# Altium PCB Driver Main Board-v1.0.PcbDoc (part 4 of 5)
Units mm, origin at the board's own origin, x right, y up, seen from the top; angles counter-clockwise.
Board outline 150 x 100 mm, 4 copper layers (Top Layer, Layer 1, Layer 2, Bottom Layer), stack 1.566 mm thick; 282 components, 222 nets, 936 pads, 397 vias.
Unrouted connection lines stored in the file: 249.
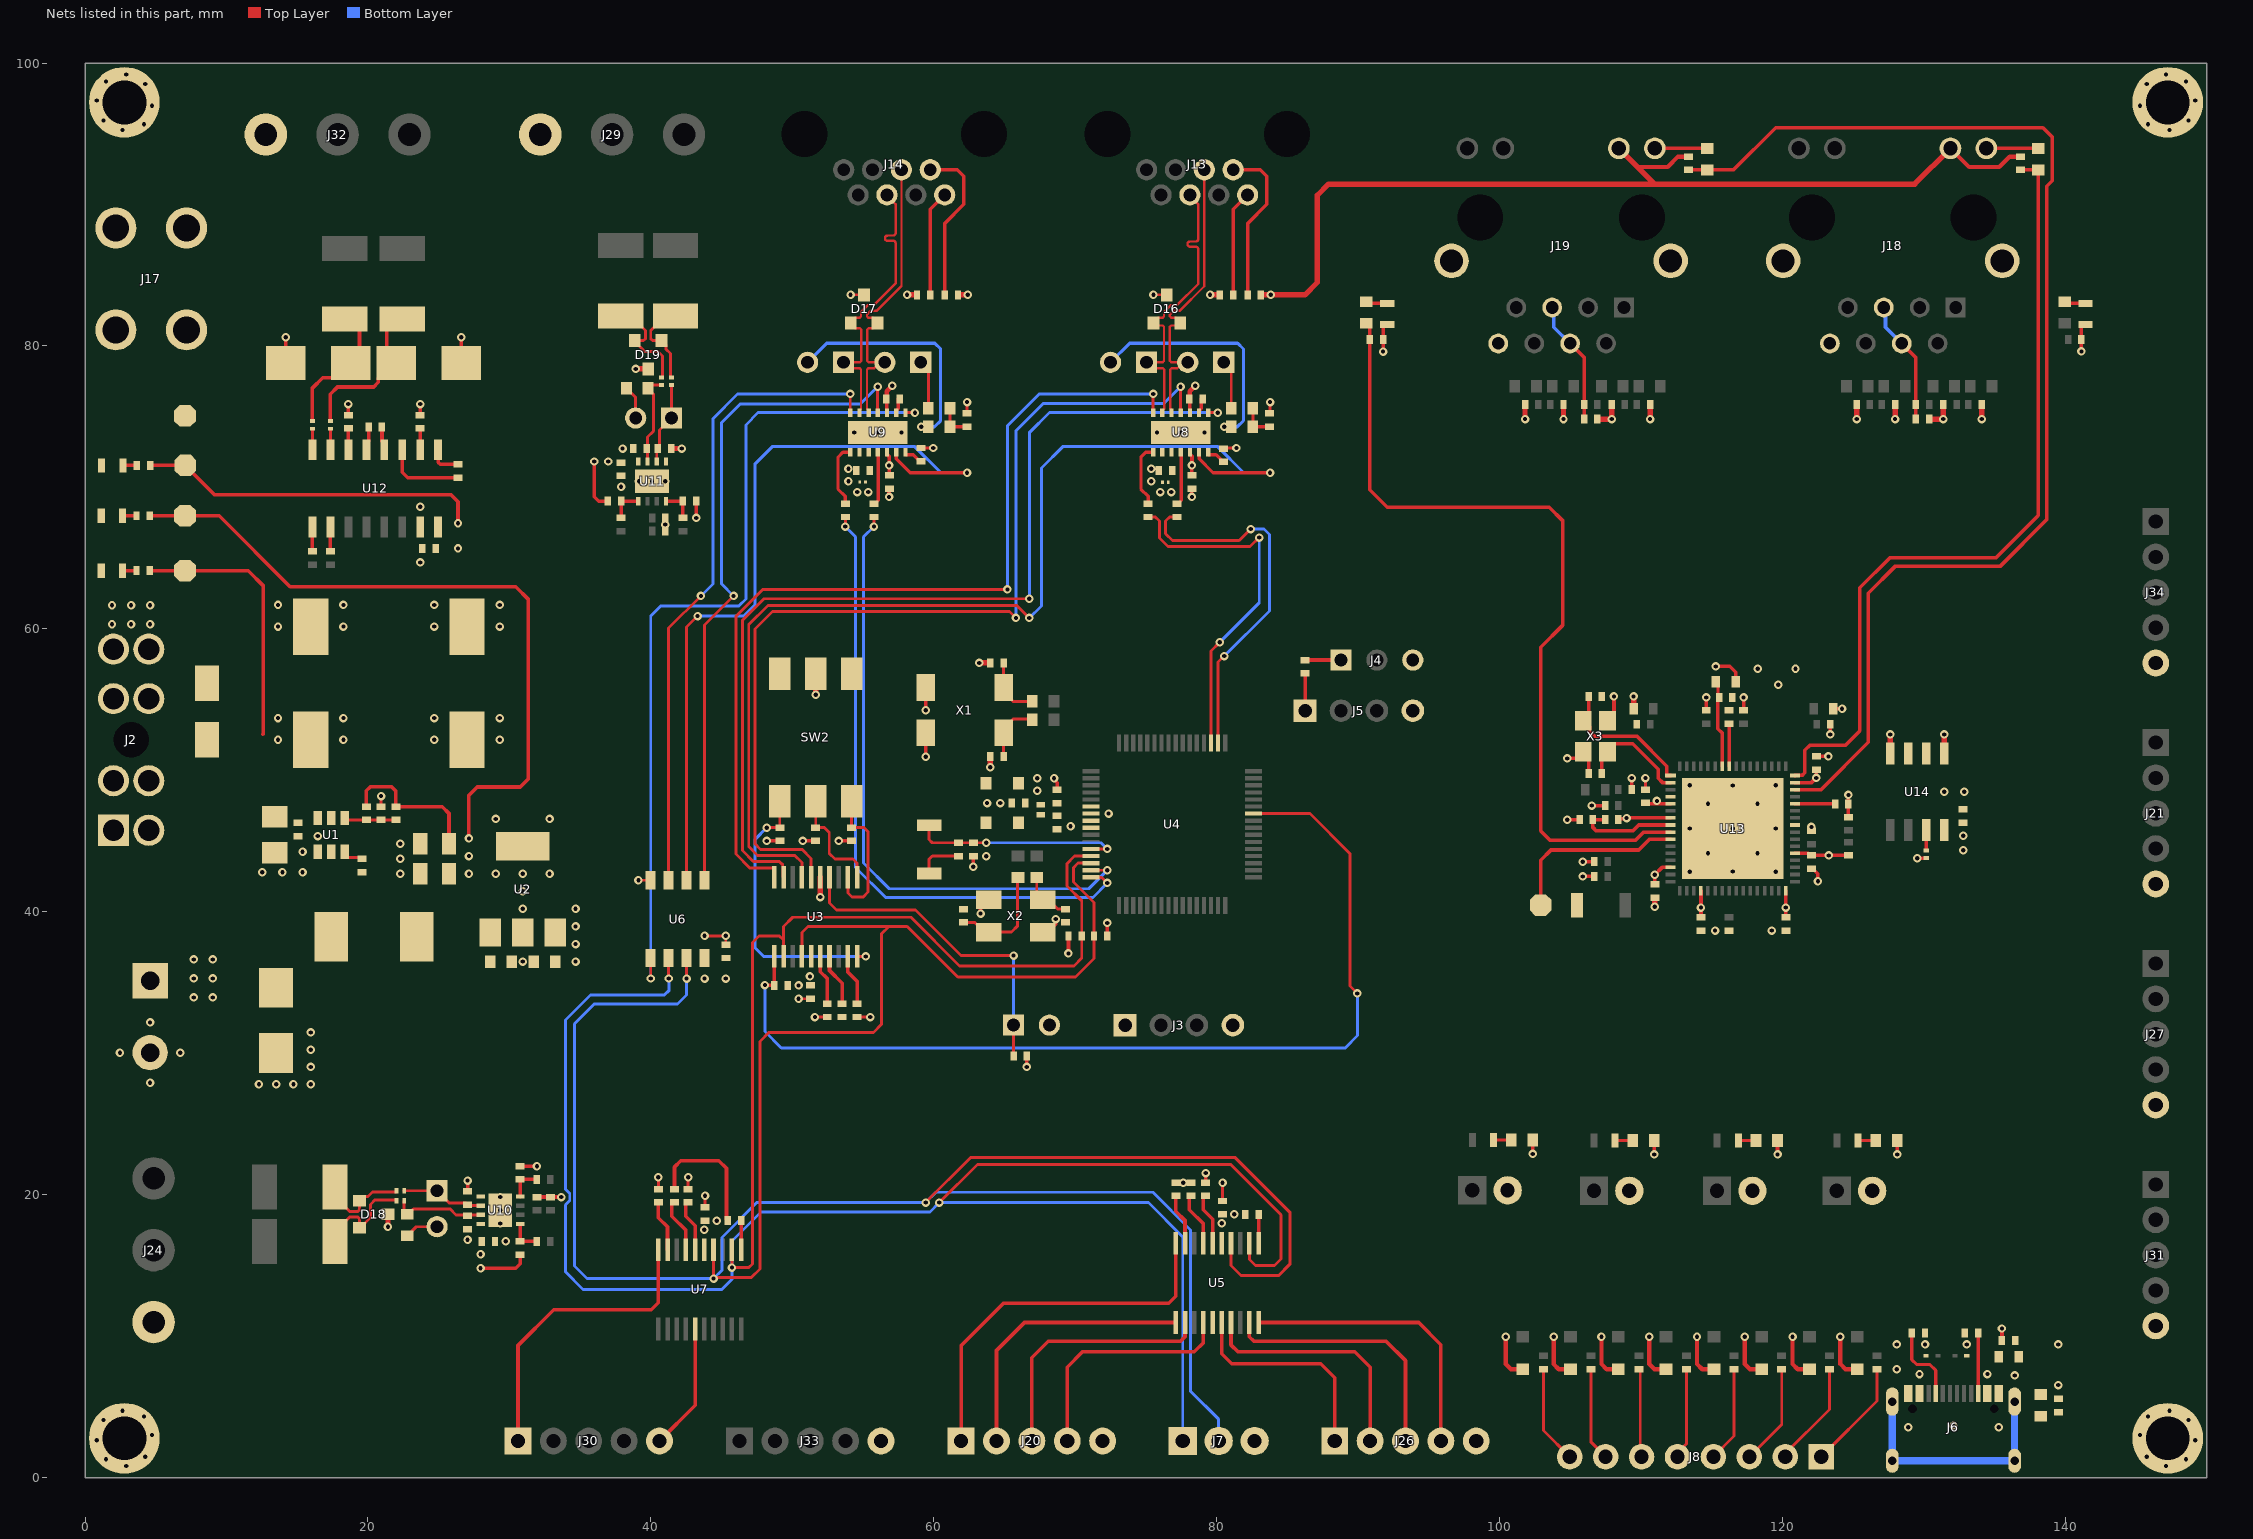
[diagram p4: the nets of this part, all layers, seen from the top]

## Via types
v1: diameter 0.6, hole 0.3, Top Layer to Bottom Layer, 397 vias

## Nets (pads, with @x,y where several pads share a name; then routed paths per layer and width w, separated by ;. In a path a pad name is that pad's centre, name@x,y a point inside that pad or via, vN(x,y) a via of type N, cw(c..) or ccw(c..) an arc to the next point about the centre after c; other vN are vias at no path point) (continued)
+3V3: (continued)
  Top Layer w0.254: R5.1@4.601,71.552 TP3.1@7.091,71.552 9.174,69.468 25.878,69.468 26.364,68.982 v1(26.364,67.461) ; R73.1@27.041,20.243 v1(27.041,20.999) ; v1(27.958,14.806) 30.44,14.806 30.758,15.124 R64.2@30.758,15.769 ; R70.2@30.758,22.02 v1(31.945,22.02) ; R66.2@31.945,19.836 R68.2@32.887,19.836 v1(33.655,19.836) ; v1(35.99,71.831) 35.99,69.349 36.308,69.031 R65.2@36.953,69.031 ; R69.2@41.02,66.902 v1(41.02,67.373) R67.2@41.02,67.843 ; R21.2@41.666,20.395 41.666,21.955 42.113,22.403 44.804,22.403 45.343,21.864 45.343,18.253 R19.2@45.436,18.16 ; v1(43.204,67.843) R71.2@43.204,69.031 ; v1(48.196,45.009) R42.2@49.111,45.009 ; v1(50.736,45.009) R41.2@51.651,45.009 ; v1(53.276,45.009) R32.2@54.191,45.009 ; U9.5@56.691,72.486 56.691,72.336 56.836,72.191 v1(56.836,71.554) 56.835,71.553 56.835,70.855 C28.2@56.833,70.853 ; v1(62.79,43.177) R43.2@62.79,43.939 ; v1(66.573,29.032) R112.2@66.573,29.821 ; v1(69.52,37.059) R28.2@69.52,38.216 ; R29.2@72.263,38.339 v1(72.263,39.215) ; U8.5@78.104,72.486 78.104,72.336 78.248,72.191 v1(78.248,71.554) 78.247,71.553 78.247,70.855 C26.2@78.246,70.853 ; R16.2@79.218,20.851 v1(79.218,21.531) ; J5.1@86.242,54.216 R6.2@86.242,56.857 ; v1(91.756,79.604) R110.2@91.756,80.442 91.756,81.386 91.879,81.509 LED9.1@92.056,81.509 ; v1(102.337,22.885) R23.1@102.337,23.868 ; v1(105.875,43.542) R92.1@106.695,43.542 ; R88.1@108.397,46.51 108.456,46.569 108.91,46.569 v1(108.969,46.628) ; v1@108.976,46.635 U13.7@112.074,46.635 ; C55.2@110.302,47.695 110.36,47.637 U13.5@112.072,47.637 ; v1(110.934,22.851) R24.1@110.934,23.833 ; C46.2@110.967,41.941 v1(110.967,42.622) 111.48,43.135 U13.14@112.074,43.135 ; v1@111.121,47.637 U13.5@112.072,47.637 ; U13.5@112.074,47.635 U13.5@112.072,47.637 ; C48.2@114.229,39.614 U13.20@114.229,41.491 ; v1(115.282,57.346) 116.27,57.346 116.682,56.934 FB3.1@116.682,56.254 ; v1(119.64,22.851) R25.1@119.64,23.833 ; C50.2@120.229,39.614 U13.32@120.229,41.491 ; U13.37@120.874,44.135 121.796,44.135 121.948,43.983 C52.2@122.037,43.983 122.04,43.986 124.65,43.986 R86.2@124.653,43.99 ; U13.47@120.874,49.135 122.042,49.135 122.367,49.46 v1(122.376,49.46) v1(122.376,49.46) 122.378,50.042 C54.2@122.38,50.044 ; FB1.1@123.597,54.347 v1(124.201,54.347) ; R87.2@124.653,46.695 R91.1@124.653,47.635 v1(124.653,48.26) ; v1(128.104,22.851) R26.1@128.104,23.833 ; v1(141.121,79.609) R106.2@141.121,80.447 141.121,81.386 141.244,81.509 LED8.1@141.421,81.509
  Top Layer w0.381: R75.1@41.427,72.748 v1(42.183,72.748) ; FB2.1@109.468,54.347 v1@109.468,55.222
  other v1: 27.958,15.794 43.776,17.526 80.358,17.982 44.662,18.16 81.244,18.616 50.44,34.797 43.795,35.281 45.294,35.281 51.244,35.432 34.671,36.477 34.671,37.721 34.671,38.964 34.671,40.208 114.229,40.296 120.229,40.296 123.269,43.986 132.769,44.342 132.769,45.383 72.349,46.939 111.121,47.84 67.319,48.558 67.319,49.439 109.468,55.223 26.364,65.684 36.978,71.831
+5V: C7.2 C8.2 C9.2 C10.2 C25.1 C27.1 D14.1 D15.1 L1.2 R1.2 R4.1 R46.1 R47.1 R113.2 TP2.1 U2.1 U8.3 U8.10 U9.3 U9.10 | length 65.3
  Top Layer w0.254: R4.1@4.576,67.996 TP2.1@7.065,67.996 9.477,67.996 14.492,62.98 30.441,62.98 31.344,62.078 31.344,49.403 30.759,48.819 27.726,48.819 27.137,48.23 v1(27.137,45.187) ; C7.2@19.882,47.436 19.882,48.55 20.159,48.827 21.682,48.827 21.971,48.538 R1.2@21.971,47.434 25.248,47.434 25.73,46.952 C9.2@25.73,44.806 ; R47.1@56.653,76.251 56.672,76.232 56.672,75.305 U9.10@56.691,75.286 ; R46.1@78.063,76.251 78.104,76.21 U8.10@78.104,75.286 ; R113.2@135.507,9.704 v1(135.507,10.542)
  Top Layer w0.305: R47.1@56.676,76.251 56.676,76.794 v1(57.069,77.188) ; R46.1@78.088,76.251 78.088,76.794 v1(78.482,77.188)
  other v1: 27.137,42.697 27.137,43.942 54.591,69.669 55.366,69.669 76.004,69.669 76.778,69.669
+24V: C1.1 C2.1 C4.2 C5.2 D22.1 R3.1 TP1.1 U1.2 U1.3 | length 19
  Top Layer w0.254: R3.1@4.576,64.11 TP1.1@7.065,64.11 11.532,64.11 12.609,63.032 12.609,57.879 12.609,52.589 12.573,52.553
  other v1: 13.64,52.159 18.263,52.159 24.689,52.159 29.312,52.159 13.64,53.696 18.263,53.696 24.689,53.696 29.312,53.696
CAN1_N: D16.2 J10.2 J13.5 U8.12 | length 21.4
  Top Layer w0.165: U8.12@76.804,75.286 76.738,75.353 76.738,75.569 76.707,75.6 76.707,78.326 76.804,78.422 77.207,78.422 J10.2@77.626,78.842 ; J10.2@77.965,78.842 J10.2@77.626,78.842 ; J13.5@79.122,92.456 79.119,92.453 79.119,84.222 77.374,82.477 76.937,82.477 76.688,82.228 76.688,82.091 76.784,81.994 77.101,81.994 77.428,81.667 D16.2@77.428,81.617 77.261,81.45 76.784,81.45 76.688,81.353 76.688,78.938 76.784,78.842 J10.2@77.626,78.842
CAN1_P: D16.1 J9.1 J13.4 U8.13 | length 21.4
  Top Layer w0.165: U8.13@76.154,75.286 76.155,75.436 76.288,75.568 76.288,78.326 76.191,78.422 75.449,78.422 J9.1@75.03,78.842 76.172,78.842 76.268,78.938 76.268,81.353 76.172,81.45 75.695,81.45 D16.1@75.528,81.617 75.528,81.667 75.855,81.994 76.172,81.994 76.268,82.091 76.268,82.401 76.764,82.896 77.2,82.896 78.7,84.396 78.7,86.749 78.7,86.832 ccw(c78.515,86.832) 78.515,87.016 78.116,87.016 cw(c78.116,87.2) 78.116,87.384 78.515,87.384 ccw(c78.515,87.569) 78.7,87.569 78.7,89.178 78.7,90 78.102,90.598 J13.4@78.102,90.676
CAN1_RX: R48.2 U4.50 | length 26.1
  Top Layer w0.203: R48.2@77.174,67.907 76.677,67.907 76.387,67.618 76.387,66.728 76.872,66.243 81.585,66.243 v1(82.398,67.056) ; U4.50@80.094,51.939 80.094,57.648 v1(80.525,58.078)
  Bottom Layer w0.203: v1(80.525,58.078) 83.719,61.273 83.719,66.666 83.329,67.056 v1(82.398,67.056)
CAN1_TX: R49.2 U4.51 | length 25.6
  Top Layer w0.203: R49.2@75.156,67.907 75.654,67.907 75.943,67.618 75.943,66.421 76.552,65.811 82.361,65.811 83.001,66.451 v1(83.002,66.451) ; U4.51@79.595,51.939 79.595,58.442 v1(80.212,59.06)
  Bottom Layer w0.203: v1(80.212,59.06) 83.002,61.85 v1(83.002,66.451)
CAN2_N: D17.2 J12.2 J14.5 U9.12 | length 21.3
  Top Layer w0.165: U9.12@55.391,75.286 55.391,75.436 55.271,75.556 55.271,78.326 55.368,78.422 55.781,78.422 J12.2@56.2,78.842 ; J12.2@56.539,78.842 J12.2@56.2,78.842 ; J14.5@57.719,92.447 57.719,84.242 55.954,82.477 55.525,82.477 55.275,82.228 55.275,82.091 55.372,81.994 55.688,81.994 56.016,81.667 56.016,81.567 55.688,81.239 55.385,81.239 55.288,81.143 55.288,78.938 55.385,78.842 J12.2@56.2,78.842
CAN2_P: D17.1 J11.1 J14.4 U9.13 | length 21.3
  Top Layer w0.165: U9.13@54.741,75.286 54.741,75.436 54.852,75.546 54.852,78.326 54.755,78.422 54.037,78.422 J11.1@53.618,78.842 54.772,78.842 54.869,78.938 54.869,81.143 54.772,81.239 54.443,81.239 54.116,81.567 D17.1@54.116,81.617 54.116,81.667 54.443,81.994 54.76,81.994 54.856,82.091 54.856,82.401 55.351,82.896 55.781,82.896 57.3,84.415 57.3,87.168 57.3,87.25 ccw(c57.116,87.25) 57.116,87.434 56.73,87.434 cw(c56.73,87.618) 56.73,87.803 57.116,87.803 ccw(c57.116,87.987) 57.3,87.987 57.3,88.499 57.3,90.012 56.689,90.623 J14.4@56.689,90.676
CAN2_RX: R50.2 U4.15 | length 44.5
  Top Layer w0.203: v1(55.762,67.234) R50.2@55.762,67.907 ; U4.15@71.095,42.939 v1(72.263,42.939)
  Bottom Layer w0.203: v1(55.762,67.234) 55.034,66.506 55.034,43.447 56.85,41.631 70.954,41.631 v1(72.263,42.939)
CAN2_TX: R51.2 U4.16 | length 45.5
  Top Layer w0.203: v1(53.744,67.234) R51.2@53.744,67.907 ; U4.16@71.095,42.439 71.099,42.435 71.865,42.435 v1(72.263,42.037)
  Bottom Layer w0.203: v1(53.744,67.234) 54.472,66.506 54.472,43.14 56.596,41.016 71.242,41.016 v1(72.263,42.037)
"CHASIS GND": "J18.Shield 1" "J18.Shield 2" "J19.Shield 1" "J19.Shield 2" J17.1 J18.8 J19.8 pad.MH1
  other v1: 2.904,0.82 147.096,0.82 1.484,1.303 148.516,1.303 4.25,1.482 145.75,1.482 0.821,2.648 149.179,2.648 4.732,3.014 145.268,3.014 1.304,4.069 148.696,4.069 4.172,4.324 145.828,4.324 2.65,4.731 147.35,4.731 2.65,95.269 147.35,95.269 4.172,95.676 145.828,95.676 1.304,95.931 148.696,95.931 4.732,96.986 145.268,96.986 0.821,97.352 149.179,97.352 4.25,98.518 145.75,98.518 1.484,98.697 148.516,98.697 2.904,99.18 147.096,99.18
EN_CAN: U3.17 U8.6 | length 76.1
  Top Layer w0.203: U3.17@50.676,42.448 50.676,43.474 50.173,43.977 47.544,43.977 46.916,44.605 46.916,60.303 48.274,61.661 65.866,61.661 v1(66.751,60.776)
  Top Layer w0.229: U8.6@78.754,72.486 78.762,72.477 78.762,72.016 79.734,71.044 v1(83.766,71.044)
  Bottom Layer w0.203: v1(66.751,60.776) 67.602,61.626 67.602,71.365 69.116,72.879 80.067,72.879 81.902,71.044 v1(83.766,71.044)
EN_CAN_2: U6.2 U9.6 | length 55.5
  Top Layer w0.203: U6.2@42.525,42.233 42.525,60.127 v1(43.303,60.905)
  Top Layer w0.229: U9.6@57.341,72.486 57.35,72.477 57.35,72.016 58.322,71.044 v1(62.354,71.044)
  Bottom Layer w0.203: v1(43.303,60.905) 46.553,60.905 47.371,61.723 47.371,71.671 48.579,72.879 58.654,72.879 60.49,71.044 v1(62.354,71.044)
ERRLED: R110.1 R111.2 U13.9 | length 58.7
  Top Layer w0.254: R111.2@90.575,81.598 90.816,81.357 R110.1@90.816,80.442 90.816,69.839 92.05,68.605 103.505,68.605 104.445,67.666 104.445,60.243 102.898,58.696 102.898,45.717 103.555,45.059 109.605,45.059 110.181,45.635 U13.9@112.074,45.635
GND: C1.2 C2.2 C4.1 C5.1 C8.1 C9.1 C10.1 C11.1 C12.1 C13.1 C14.1 C15.2 C16.1 C17.1 C18.1 C19.1 C20.1 C21.1 C22.1 C23.1 C24.1 C25.2 C26.1 C27.2 C28.1 C29.2 C30.2 C31.1 C32.1 C33.1 C34.1 C37.1 C38.1 C39.1 C40.1 C41.1 C42.1 C43.1 C44.1 C45.1 C46.1 C47.1 C48.1 C49.1 C50.1 C51.1 C52.1 C53.1 C54.1 C55.1 C56.1 C57.1 C58.1 C59.1 C60.1 C61.1 C62.1 C63.1 C64.1 C65.1 C66.1 D1.1 D2.2 D3.2 D4.2 D5.2 D6.2 D7.2 D8.2 D9.2 D10.2 D11.2 D12.2 D13.2 D14.2 D15.2 D16.3 D17.3 D18.3 D19.3 D20.1 D21.1 J1.2 J3.4 J4.3 J5.4 J6.A1/B12 J6.B1/A12 J7.3 J18.10 J19.10 J20.5 J21.5 J22.2 J23.2 J24.3 J25.2 J26.5 J27.5 J28.2 J29.3 J30.5 J31.5 J32.3 J33.5 J34.5 J35.2 LED1.2 LED2.2 LED3.2 R2.1 R12.2 R13.2 R14.2 R17.2 R18.2 R20.2 R22.2 R27.2 R30.2 R31.2 R44.1 R45.1 R56.1 R57.1 R58.1 R59.1 R72.2 R74.2 R89.1 R90.1 R97.2 R108.1 R109.1 SW1.1 SW2.4 SW2.5 SW2.6 SW3.1 TP4.1 U1.4 U2.2 U2.4 U3.15 U4.9 U5.15 U6.4 U7.15 U8.2 U8.15 U9.2 U9.15 U10.5 U10.9 U11.5 U11.9 U12.15 U13.4 U13.41 U13.65 U14.1 U14.2 U14.3 U14.4 X1.2 X1.3 X2.2 X2.4 X3.2 X3.4 | length 173.1
  Top Layer w0.203: R2.1@20.927,47.434 v1(20.927,48.184) ; v1(39.116,42.233) U6.4@39.985,42.233 ; R22.2@40.526,20.395 v1(40.526,21.234) ; R20.2@42.636,20.395 v1(42.636,21.234) ; v1(43.795,38.298) v1(45.294,38.298) C18.1@45.294,37.673 ; C19.1@43.827,19.1 v1(43.827,19.926) ; v1(50.44,33.857) C16.1@51.275,33.857 ; v1(51.593,32.562) R12.2@52.466,32.562 ; v1(54.116,83.617) D17.3@55.066,83.617 ; R14.2@54.576,32.562 v1(55.508,32.562) ; SW1.1@59.666,42.709 59.666,43.711 59.895,43.939 C24.1@61.749,43.939 ; X2.2@67.827,38.573 68.077,38.573 68.626,39.121 v1(68.626,39.482) ; v1(75.528,83.617) D16.3@76.478,83.617 ; v1@77.425,20.851 R17.2@78.163,20.851 ; C17.1@80.409,19.556 v1(80.409,20.851)
  Top Layer w0.229: R45.1@59.091,72.786 v1(59.968,72.786) ; C30.2@62.353,75.235 v1(62.353,76.035) ; R44.1@80.503,72.786 v1(81.392,72.786) ; C29.2@83.766,75.235 v1(83.766,76.035) ; C47.1@109.337,48.635 v1(109.337,49.455) ; C55.1@110.302,48.635 v1(110.302,49.455)
  Top Layer w0.254: D20.1@14.195,78.791 v1(14.195,80.62) ; C34.1@18.614,75.108 v1(18.614,75.895) ; C33.1@23.694,75.108 v1(23.694,75.895) ; D21.1@26.595,78.791 v1(26.595,80.62) ; J30.5@40.604,2.591 43.126,5.112 U7.15@43.126,10.509 ; v1(56.833,69.326) C28.1@56.833,69.913 ; v1(59.432,50.964) X1.3@59.432,52.654 ; v1(59.432,54.254) X1.2@59.432,55.854 ; v1(63.302,39.872) 63.302,40.366 63.808,40.873 X2.4@64.027,40.873 ; v1(68.503,49.439) 68.503,49.345 68.716,49.132 C21.1@68.716,48.628 ; v1(78.246,69.326) C26.1@78.246,69.913 ; v1(104.778,46.51) R89.1@105.654,46.51 ; v1(104.778,50.844) 105.305,50.844 ; v1(105.875,42.5) C43.1@106.695,42.5 ; X3.2@105.907,51.311 106.288,50.931 C41.1@106.288,49.772 ; v1(106.507,47.51) C49.1@107.457,47.51 ; X3.4@107.607,53.511 108.08,53.984 v1(108.08,55.223) ; C44.1@114.603,54.248 v1(114.603,55.153) ; C45.1@117.241,54.248 v1(117.241,55.153) ; C52.1@122.037,43.043 122.126,43.043 122.482,42.688 122.482,42.17 v1(122.495,42.157) ; C54.1@122.381,50.984 v1@123.239,50.984 ; v1(123.367,52.539) C39.1@123.367,53.257 ; v1(129.517,43.792) R97.2@130.152,43.792
  Top Layer w0.305: v1(100.436,9.952) 100.436,8.035 100.804,7.668 D4.2@101.63,7.668 ; v1(103.815,9.952) 103.815,8.035 104.182,7.668 D5.2@105.008,7.668 ; v1(107.193,9.952) 107.193,8.035 107.56,7.668 D6.2@108.386,7.668 ; 109.744,92.649 111.879,92.649 112.612,93.382 R109.1@113.359,93.382 ; v1(110.571,9.952) 110.571,8.035 110.938,7.668 D7.2@111.765,7.668 ; v1(113.949,9.952) 113.949,8.035 114.317,7.668 D8.2@115.143,7.668 ; v1(117.327,9.952) 117.327,8.035 117.695,7.668 D9.2@118.521,7.668 ; v1(120.706,9.952) 120.706,8.035 121.073,7.668 D10.2@121.899,7.668 ; v1(124.084,9.952) 124.084,8.035 124.451,7.668 D12.2@125.277,7.668 ; J18.10@131.867,93.966 133.184,92.649 135.319,92.649 136.052,93.382 R108.1@136.799,93.382
  Top Layer w0.381: v1(21.414,17.738) D18.3@21.414,18.616 ; v1(38.922,78.375) D19.3@39.8,78.375 ; v1(51.651,55.347) SW2.5@51.651,56.824 ; v1(51.976,41.044) U3.15@51.976,42.448 ; v1(58.112,83.617) R59.1@58.81,83.617 ; R58.1@61.709,83.617 v1(62.406,83.617) ; v1(63.205,57.594) C14.1@63.992,57.594 ; v1(63.992,50.209) C15.2@63.992,50.964 ; v1(79.525,83.617) R57.1@80.222,83.617 ; R56.1@83.121,83.617 v1(83.819,83.617) 86.24,83.617 87.104,84.482 87.104,90.645 87.899,91.44 110.953,91.44 ; v1(101.793,74.828) C58.1@101.793,75.844 ; v1(104.512,74.828) C60.1@104.512,75.844 ; C66.1@106.912,74.828 v1(107.915,74.828) C62.1@107.915,75.844 ; J19.10@108.427,93.966 109.744,92.649 110.953,91.44 ; v1(110.633,74.828) C64.1@110.633,75.844 ; v1(110.967,40.361) C46.1@110.967,41.002 ; v1(125.233,74.828) C57.1@125.233,75.844 ; U14.4@127.612,51.182 v1(127.612,52.539) ; v1(127.952,74.828) C59.1@127.952,75.844 ; C65.1@130.351,74.828 v1(131.355,74.828) C61.1@131.355,75.844 ; U14.1@131.422,51.182 v1(131.422,52.539) ; J18.10@131.867,93.966 129.34,91.44 110.953,91.44 ; v1(134.073,74.828) C63.1@134.073,75.844
  other v1: 128.877,3.57 135.277,3.57 139.487,6.545 136.402,7.223 128.071,7.668 128.071,9.418 130.067,9.418 133.017,9.418 139.487,9.418 29.736,16.708 27.041,16.817 29.358,17.966 29.358,18.901 29.358,19.836 77.639,20.851 12.294,27.813 13.513,27.813 14.732,27.813 15.951,27.813 4.6,27.907 15.951,29.032 2.464,30.043 6.736,30.043 15.951,30.251 15.951,31.471 4.6,32.179 30.937,36.477 115.229,38.674 119.229,38.674 30.937,40.208 30.937,41.453 22.288,42.697 29.037,42.697 30.937,42.697 32.837,42.697 12.522,42.797 13.951,42.797 15.38,42.797 113.438,42.831 119.51,42.831 116.474,42.849 22.288,43.752 63.698,43.929 114.724,44.135 118.224,44.135 15.38,44.241 22.281,44.806 16.449,45.352 113.438,45.885 116.474,45.885 119.51,45.885 122.039,45.998 69.665,46.048 29.037,46.565 32.837,46.565 114.724,47.635 118.224,47.635 63.763,47.688 64.703,47.688 131.422,48.482 132.845,48.482 116.474,48.921 113.438,48.939 119.51,48.939 123.24,50.985 119.698,56.047 118.246,57.175 120.912,57.175 13.64,60.159 18.263,60.159 24.689,60.159 29.312,60.159 13.64,61.696 18.263,61.696 24.689,61.696 29.312,61.696 23.694,64.694 23.694,68.631 37.892,70.053 39.15,70.431 40.085,70.431 41.02,70.431 53.966,70.434 75.378,70.434 53.966,71.327 75.378,71.327 38.001,72.748 54.368,73.886 56.041,73.886 57.715,73.886 75.78,73.886 77.454,73.886 79.127,73.886
I2C3_SCL: J7.1 R28.1 U3.2 U4.13 U5.2 U6.6 U7.2 | length 188
  Top Layer w0.203: v1(41.255,35.284) U6.6@41.255,36.733 ; U7.2@45.726,16.109 v1(45.726,14.853) 46.914,14.853 47.174,15.113 47.174,37.832 47.64,38.298 49.074,38.298 49.376,37.996 ; U3.2@49.376,36.848 49.376,37.996 ; v1(60.388,19.443) 63.081,22.136 80.994,22.136 84.551,18.579 84.551,15.463 84.092,15.004 82.729,15.004 82.308,15.425 U5.2@82.308,16.565 ; U4.13@71.095,43.939 69.956,43.939 69.413,43.396 69.413,41.831 70.46,40.784 R28.1@70.46,38.278 70.46,36.728 69.901,36.17 61.824,36.17 58.383,39.61 50.021,39.61 49.376,38.965 49.376,37.996
  Bottom Layer w0.203: v1@41.292,35.284 41.292,34.456 40.948,34.112 35.729,34.112 33.96,32.343 33.96,20.386 34.26,20.086 34.26,19.585 33.96,19.285 33.96,14.554 35.204,13.31 45.009,13.31 45.726,14.027 v1(45.726,14.853) 45.726,16.724 47.786,18.785 59.729,18.785 v1(60.388,19.443) 75.172,19.443 77.597,17.018 J7.1@77.597,2.591
I2C3_SDA: J7.2 R29.1 U3.4 U4.14 U5.4 U6.7 U7.4 | length 202.6
  Top Layer w0.203: v1(42.525,35.281) U6.7@42.525,36.733 ; v1(44.426,14.071) U7.4@44.426,16.109 ; v1@44.527,14.147 47.094,14.147 47.701,14.754 47.701,30.842 48.33,31.471 55.728,31.471 56.312,32.054 56.312,38.448 56.827,38.964 ; U3.4@50.676,36.848 50.676,38.541 51.098,38.964 56.827,38.964 ; v1(59.423,19.443) 62.598,22.618 81.312,22.618 85.166,18.764 85.166,15.088 84.379,14.3 81.712,14.3 81.008,15.004 U5.4@81.008,16.565 ; U4.14@71.095,43.439 70.199,43.439 69.875,43.115 69.875,42.102 71.323,40.654 R29.1@71.323,38.278 ; R29.1@71.277,38.324 R29.1@71.323,38.278 ; 56.827,38.964 58.115,38.964 61.697,35.382 70.019,35.382 71.323,36.687 R29.1@71.323,38.278
  Bottom Layer w0.203: v1(42.525,35.281) 42.525,34.112 41.89,33.477 35.992,33.477 34.595,32.08 34.595,14.961 35.485,14.071 v1(44.426,14.071) 45.015,14.66 45.015,16.974 47.485,19.443 v1(59.423,19.443) 60.153,20.173 75.483,20.173 78.152,17.504 78.152,6.108 80.137,4.123 J7.2@80.137,2.591
ID0: R42.1 SW2.1 U3.10 | length 20.3
  Top Layer w0.203: v1(48.196,45.949) R42.1@49.111,45.949 SW2.1@49.111,47.824 ; U3.10@54.576,36.848 v1(55.194,36.848)
  Bottom Layer w0.203: v1(48.196,45.949) 47.371,45.124 47.371,37.451 47.974,36.848 v1(55.194,36.848)
ID1: R41.1 SW2.2 U3.11 | length 7.7
  Top Layer w0.203: SW2.2@51.651,47.824 R41.1@51.651,45.949 52.255,45.949 52.606,45.597 52.606,44.124 53.009,43.721 54.285,43.721 54.575,43.432 U3.11@54.576,42.448 U3.11@54.576,42.448
ID2: R32.1 SW2.3 U3.12 | length 10.2
  Top Layer w0.203: U3.12@53.926,42.448 53.926,41.326 54.207,41.044 55.008,41.044 55.357,41.393 55.357,45.656 55.064,45.949 R32.1@54.191,45.949 SW2.3@54.191,47.824
IND-ZC: J35.1 R112.1 U3.14 | length 23.5
  Top Layer w0.203: U3.14@52.626,42.448 52.626,40.622 53.116,40.132 58.699,40.132 61.925,36.906 v1(65.634,36.906) ; R112.1@65.634,29.821 J35.1@65.634,31.991
  Bottom Layer w0.203: J35.1@65.634,31.991 v1(65.634,36.906)
INH_MASK: U3.16 U8.11 | length 68
  Top Layer w0.203: U3.16@51.326,42.448 51.326,43.772 50.695,44.403 47.753,44.403 47.349,44.807 47.349,59.98 48.597,61.228 65.354,61.228 v1(65.807,60.776) ; U8.11@77.44,75.299 v1(77.44,77.12)
  Bottom Layer w0.203: v1(65.807,60.776) 65.807,74.007 67.738,75.938 76.259,75.938 v1(77.44,77.12)
INH_MASK_2: U6.1 U9.11 | length 47.4
  Top Layer w0.203: U6.1@43.795,42.233 43.795,60.28 v1(45.847,62.332) ; U9.11@56.028,75.299 v1(56.028,77.12)
  Bottom Layer w0.203: v1(45.847,62.332) 45.004,63.175 45.004,74.586 46.327,75.909 54.817,75.909 v1(56.028,77.12)
INT_EXP: R11.1 U3.1 U4.42 | length 69.8
  Top Layer w0.203: U4.42@82.594,46.939 86.585,46.939 89.418,44.106 89.418,34.752 v1(89.94,34.231)
  Top Layer w0.254: v1(48.057,34.816) 48.067,34.806 48.716,34.806 R11.1@48.726,34.797 U3.1@48.726,36.838
  Bottom Layer w0.203: v1(48.057,34.816) 48.057,31.541 49.22,30.378 89.087,30.378 89.959,31.251 89.959,34.212 v1(89.94,34.231)
LEDPOL0: R104.1 R108.2 U13.48 | length 57.3
  Top Layer w0.254: U13.48@120.874,49.635 120.878,49.64 121.369,49.64 121.566,49.837 121.566,51.417 121.932,51.783 124.449,51.783 125.451,52.784 125.451,62.896 127.569,65.015 135.068,65.015 138.073,68.02 R104.1@138.073,92.442 R108.2@136.828,92.442
LEDPOL1: R105.1 R109.2 U13.46 | length 86.3
  Top Layer w0.254: R109.2@113.359,92.442 R105.1@114.68,92.442 116.521,92.442 119.507,95.428 138.405,95.428 139.065,94.767 139.065,91.669 138.684,91.288 138.684,67.728 135.368,64.413 127.945,64.413 126.06,62.528 126.06,51.977 122.719,48.635 U13.46@120.874,48.635
NetC6_1: C6.1 L1.1 U1.5
NetC6_2: C6.2 U1.6 | length 1.5
  Top Layer w0.203: U1.6@18.349,44.241 18.349,44.049 18.547,43.85 19.464,43.85 C6.2@19.565,43.75
NetC7_1: C7.1 R1.1 R2.2 U1.1 | length 3.7
  Top Layer w0.203: U1.1@18.349,46.641 18.495,46.495 R2.2@20.927,46.495 R1.1@21.971,46.495
NetC12_2: C12.2 R9.1 X2.1 | length 7.5
  Top Layer w0.203: C12.2@62.27,39.253 62.892,39.253 63.024,39.121 63.229,39.121 63.777,38.573 65.483,38.573 65.927,39.017 R9.1@65.927,42.415
NetC13_2: C13.2 R10.1 X2.3 | length 3.7
  Top Layer w0.203: R10.1@67.274,42.415 67.274,41.421 67.822,40.873 67.827,40.873 68.077,40.873 68.757,40.193 C13.2@69.458,40.193
NetC14_2: C14.2 R7.1 X1.1 | length 4.4
  Top Layer w0.203: C14.2@64.932,57.594 X1.1@64.932,55.854 64.932,55.554 65.61,54.876 R7.1@66.964,54.876
NetC15_1: C15.1 R8.1 X1.4 | length 4.3
  Top Layer w0.203: C15.1@64.932,50.964 X1.4@64.932,52.654 64.932,52.954 65.61,53.632 66.913,53.632 R8.1@66.964,53.581
NetC22_2: C22.2 D2.1 L2.2 U4.7
NetC23_2: C23.2 J6.S1 J6.S2 J6.S3 J6.S4 R27.1 | length 17
  Bottom Layer w0.508: J6.S4@127.752,5.375 J6.S3@127.752,1.195 J6.S2@136.402,1.195 J6.S1@136.402,5.375
NetC29_1: C29.1 R52.2 R53.1 | length 2.5
  Top Layer w0.229: R53.1@82.56,75.59 82.56,74.295 C29.1@83.766,74.295
NetC30_1: C30.1 R54.2 R55.1 | length 2.5
  Top Layer w0.229: R55.1@61.148,75.59 61.148,74.295 C30.1@62.353,74.295
NetC33_2: C33.2 U12.2 | length 1.8
  Top Layer w0.254: U12.2@23.694,72.391 C33.2@23.694,74.168
NetC34_2: C34.2 U12.6 | length 1.8
  Top Layer w0.254: U12.6@18.614,72.391 C34.2@18.614,74.168
NetC35_1: C35.1 U12.1 | length 2.1
  Top Layer w0.254: U12.1@24.964,72.391 24.964,71.766 25.102,71.628 C35.1@26.364,71.628
NetC35_2: C35.2 U12.3 | length 5.4
  Top Layer w0.254: U12.3@22.424,72.379 22.424,71.073 22.808,70.688 C35.2@26.364,70.688
NetC36_1: C36.1 U12.4 | length 1.8
  Top Layer w0.254: C36.1@20.989,74.143 20.989,73.281 21.154,73.116 U12.4@21.154,72.391
NetC36_2: C36.2 U12.5 | length 1.8
  Top Layer w0.254: U12.5@19.884,72.391 19.884,73.116 20.049,73.281 C36.2@20.049,74.143
NetC38_2: C38.2 U13.1 X3.1 | length 10.2
  Top Layer w0.254: C38.2@106.288,55.223 106.288,53.891 X3.1@105.907,53.511 106.38,53.038 106.38,52.721 106.679,52.422 109.697,52.422 111.82,50.299 111.82,49.635 U13.1@112.074,49.635
NetC41_2: C41.2 U13.2 X3.3 | length 8
  Top Layer w0.254: C41.2@107.227,49.772 107.227,50.931 X3.3@107.607,51.311 107.607,51.404 108.08,51.877 109.409,51.877 111.207,50.078 111.207,49.439 111.511,49.135 U13.2@112.074,49.135
NetC42_2: C42.2 FB3.2 U13.58 | length 6.2
  Top Layer w0.203: FB3.2@115.282,56.254 115.447,56.09 115.447,55.219 C42.2@115.513,55.153
  Top Layer w0.254: C42.2@115.513,55.153 115.417,55.057 115.417,52.943 115.724,52.636 U13.58@115.724,50.285
NetC65_2: C65.2 J18.4 J18.5 R102.1 | length 8.8
  Top Layer w0.254: J18.4@128.422,80.176 129.412,79.186 R102.1@129.412,75.844 C65.2@129.412,74.828
  Bottom Layer w0.254: J18.5@127.152,82.716 127.271,82.597 127.271,81.327 J18.4@128.422,80.176
NetC66_2: C66.2 J19.4 J19.5 R103.1 | length 8.8
  Top Layer w0.254: J19.4@104.982,80.176 105.972,79.186 R103.1@105.972,75.844 C66.2@105.972,74.828
  Bottom Layer w0.254: J19.5@103.712,82.716 103.831,82.597 103.831,81.327 J19.4@104.982,80.176
NetD1_2: D1.2 J1.1 J2.1 J2.2 J2.7 J2.8
  other v1: 7.682,33.943 9.028,33.943 7.682,35.289 9.028,35.289 7.682,36.635 9.028,36.635
NetD18_1: D18.1 F2.1 R79.2 | length 6.5
  Top Layer w0.203: F2.1@17.672,20.547 17.672,19.837 18.707,18.802 19.279,18.802 19.414,18.937 D18.1@19.414,19.566 19.719,19.872 20.003,19.872 20.331,20.2 21.975,20.2 22.009,20.233 R79.2@22.009,20.278
NetD18_2: D18.2 F1.1 R78.2 | length 7.6
  Top Layer w0.203: F1.1@17.672,16.686 17.672,17.396 18.707,18.431 19.279,18.431 19.414,18.296 D18.2@19.414,17.666 19.464,17.666 20.181,18.384 20.181,19.314 20.505,19.638 21.975,19.638 22.009,19.605 R78.2@22.009,19.566
NetD19_1: D19.1 F4.1 R81.2 | length 6.5
  Top Layer w0.203: R81.2@41.462,77.78 41.417,77.78 41.384,77.813 41.384,79.458 41.056,79.786 41.056,80.069 D19.1@40.75,80.375 40.121,80.375 39.986,80.51 39.986,81.082 41.021,82.117 F4.1@41.731,82.117
NetD19_2: D19.2 F3.1 R80.2 | length 7.6
  Top Layer w0.203: F3.1@37.87,82.117 38.58,82.117 39.615,81.082 39.615,80.51 39.48,80.375 D19.2@38.85,80.375 38.85,80.325 39.568,79.608 40.498,79.608 40.822,79.284 40.822,77.813 40.789,77.78 R80.2@40.75,77.78
NetD20_2: D20.2 F6.2 R83.1 | length 8.9
  Top Layer w0.254: R83.1@16.074,74.693 16.074,77.029 16.795,77.75 17.754,77.75 D20.2@18.795,78.791 ; F6.2@18.363,81.913 18.638,81.913 19.401,81.15 D20.2@19.401,79.397
NetD21_2: D21.2 F5.2 R82.1 | length 11.7
  Top Layer w0.254: R82.1@17.344,74.693 17.344,76.596 17.847,77.099 20.405,77.099 20.731,77.424 20.731,77.718 21.804,78.791 D21.2@21.995,78.791 21.324,79.462 21.324,81.15 22.087,81.913 F5.2@22.427,81.913
NetD22_2: D22.2 J2.3 J2.4 J2.5 J2.6
  other v1: 1.905,60.325 3.251,60.325 4.597,60.325 1.905,61.671 3.251,61.671 4.597,61.671
NetFB5_1: FB5.1 J6.A4/B9 J6.B4/A9
  other v1: 132.08,3.683 129.677,7.323 134.477,7.323
NetFB5_2: FB5.2 R113.1
NetJ4_1: J4.1 R6.1 | length 2.5
  Top Layer w0.254: R6.1@86.242,57.797 J4.1@88.782,57.797
NetJ6_A5: J6.A5 R30.1 | length 5.5
  Top Layer w0.229: R30.1@129.128,10.212 129.128,8.348 129.48,7.996 130.408,7.996 130.827,7.577 J6.A5@130.827,5.945
NetJ6_B5: J6.B5 R31.1 | length 4.3
  Top Layer w0.229: J6.B5@133.827,5.945 R31.1@133.827,10.212
NetJ8_1: J8.1 R33.2 | length 7.8
  Top Layer w0.203: J8.1@122.731,1.475 126.672,5.415 R33.2@126.672,7.668
NetJ8_2: J8.2 R34.2 | length 7.5
  Top Layer w0.203: J8.2@120.191,1.475 120.191,1.705 123.305,4.818 R34.2@123.305,7.668
NetJ8_3: J8.3 R35.2 | length 7.1
  Top Layer w0.203: J8.3@117.651,1.475 119.937,3.761 R35.2@119.937,7.668
NetJ8_4: J8.4 R36.2 | length 6.8
  Top Layer w0.203: J8.4@115.111,1.475 116.57,2.933 R36.2@116.57,7.668
NetJ8_5: J8.5 R37.2 | length 6.5
  Top Layer w0.203: J8.5@112.571,1.475 112.571,1.763 113.203,2.394 R37.2@113.203,7.668
NetJ8_6: J8.6 R38.2 | length 6.3
  Top Layer w0.203: R38.2@109.835,7.668 109.933,7.57 109.933,1.573 J8.6@110.031,1.475
NetJ8_7: J8.7 R39.2 | length 6.6
  Top Layer w0.203: R39.2@106.468,7.668 106.468,2.498 J8.7@107.491,1.475
NetJ8_8: J8.8 R40.2 | length 7
  Top Layer w0.203: R40.2@103.101,7.668 103.101,3.325 J8.8@104.951,1.475
NetJ9_2: J9.2 R52.1 | length 17.2
  Top Layer w0.229: v1(80.528,74.295) R52.1@81.036,74.295
  Bottom Layer w0.229: J9.2@72.49,78.842 73.844,80.195 81.476,80.195 81.89,79.781 81.89,74.727 81.458,74.295 v1(80.528,74.295)
NetJ10_1: J10.1 R53.2 | length 3.5
  Top Layer w0.203: J10.1@80.491,78.842 81.025,78.308 R53.2@81.025,75.589
NetJ11_2: J11.2 R54.1 | length 17.2
  Top Layer w0.229: v1@59.091,74.295 R54.1@59.599,74.295
  Bottom Layer w0.229: J11.2@51.078,78.842 52.432,80.195 60.064,80.195 60.477,79.781 60.477,74.727 60.046,74.295 v1(59.116,74.295)
NetJ12_1: J12.1 R55.2 | length 3.5
  Top Layer w0.203: J12.1@59.079,78.842 59.612,78.308 R55.2@59.612,75.589
NetJ13_7: J13.7 R56.2 | length 11.5
  Top Layer w0.254: J13.7@81.162,92.456 83.076,92.456 83.533,91.998 83.533,90.012 82.182,88.66 R56.2@82.182,83.617
NetJ13_8: J13.8 R57.2 | length 7.5
  Top Layer w0.254: R57.2@81.162,83.617 81.162,89.656 J13.8@82.182,90.676
NetJ14_7: J14.7 R58.2 | length 11.5
  Top Layer w0.254: J14.7@59.749,92.456 61.663,92.456 62.121,91.998 62.121,90.012 60.769,88.66 R58.2@60.769,83.617
NetJ14_8: J14.8 R59.2 | length 7.5
  Top Layer w0.254: R59.2@59.749,83.617 59.749,89.656 J14.8@60.769,90.676
NetJ15_1: J15.1 R73.2 R79.1 U10.6 | length 5.8
  Top Layer w0.203: R79.1@22.559,20.278 J15.1@24.884,20.278 25.74,19.422 26.922,19.422 R73.2@27.041,19.303 ; R73.2@27.041,19.226 U10.6@27.958,19.226
NetJ15_2: J15.2 R76.2 | length 2.4
  Top Layer w0.203: R76.2@22.77,17.092 23.415,17.738 J15.2@24.884,17.738
NetJ16_1: J16.1 R75.2 R81.1 U11.6 | length 5.8
  Top Layer w0.203: U11.6@40.41,71.831 R75.2@40.41,72.748 ; R75.2@40.487,72.748 40.606,72.867 40.606,74.049 J16.1@41.462,74.905 R81.1@41.462,77.23
NetJ16_2: J16.2 R77.2 | length 2.4
  Top Layer w0.203: R77.2@38.276,77.019 38.922,76.374 J16.2@38.922,74.905
NetJ18_9: J18.9 R104.2 | length 3.7
  Top Layer w0.254: J18.9@134.407,93.966 R104.2@138.073,93.966
NetJ19_9: J19.9 R105.2 | length 3.7
  Top Layer w0.254: J19.9@110.967,93.966 R105.2@114.68,93.966
NetLED1_1: LED1.1 R3.2 | length 1
  Top Layer w0.254: LED1.1@2.647,64.11 R3.2@3.636,64.11
NetLED2_1: LED2.1 R4.2 | length 1
  Top Layer w0.254: LED2.1@2.647,67.996 R4.2@3.636,67.996
NetLED3_1: LED3.1 R5.2 | length 1
  Top Layer w0.254: LED3.1@2.672,71.552 R5.2@3.662,71.552
NetLED4_1: LED4.1 R23.2 | length 1.2
  Top Layer w0.229: LED4.1@99.566,23.868 R23.2@100.813,23.868
NetLED5_1: LED5.1 R24.2 | length 1.2
  Top Layer w0.229: LED5.1@108.163,23.833 R24.2@109.41,23.833
NetLED6_1: LED6.1 R25.2 | length 1.2
  Top Layer w0.229: LED6.1@116.87,23.833 R25.2@118.116,23.833
NetLED7_1: LED7.1 R26.2 | length 1.2
  Top Layer w0.229: LED7.1@125.333,23.833 R26.2@126.58,23.833
NetLED8_2: LED8.2 R107.1 | length 1.5
  Top Layer w0.254: R107.1@139.94,83.122 140.054,83.009 LED8.2@141.421,83.009
NetLED9_2: LED9.2 R111.1 | length 1.5
  Top Layer w0.254: R111.1@90.575,83.122 90.689,83.009 LED9.2@92.056,83.009
NetR12_1: R12.1 U3.6 | length 3.5
  Top Layer w0.254: U3.6@51.976,36.848 51.976,35.772 52.466,35.282 R12.1@52.466,33.501
NetR13_1: R13.1 U3.7 | length 3.7
  Top Layer w0.254: U3.7@52.626,36.848 52.626,35.85 53.521,34.955 R13.1@53.521,33.501
NetR14_1: R14.1 U3.9 | length 3.6
  Top Layer w0.254: U3.9@53.926,36.848 53.926,35.74 54.576,35.09 R14.1@54.576,33.501
NetR15_1: R15.1 U5.1 | length 2.1
  Top Layer w0.254: U5.1@82.958,16.565 R15.1@82.958,18.616
NetR16_1: R16.1 U5.6 | length 3.7
  Top Layer w0.254: R16.1@79.218,19.912 79.137,19.912 79.035,19.81 79.035,18.935 79.708,18.262 U5.6@79.708,16.565
NetR17_1: R17.1 U5.7 | length 3.9
  Top Layer w0.254: R17.1@78.248,19.912 78.166,19.912 78.064,19.81 78.064,18.931 79.058,17.937 U5.7@79.058,16.565
NetR18_1: R18.1 U5.9 | length 3.6
  Top Layer w0.254: R18.1@77.108,19.912 77.108,18.832 77.758,18.182 U5.9@77.758,16.565
NetR19_1: R19.1 U7.1 | length 2.1
  Top Layer w0.254: U7.1@46.376,16.109 R19.1@46.376,18.16
NetR20_1: R20.1 U7.6 | length 3.7
  Top Layer w0.254: R20.1@42.636,19.456 42.554,19.456 42.453,19.354 42.453,18.479 43.126,17.806 U7.6@43.126,16.109
NetR21_1: R21.1 U7.7 | length 3.9
  Top Layer w0.254: R21.1@41.666,19.456 41.583,19.456 41.482,19.354 41.482,18.475 42.476,17.481 U7.7@42.476,16.109
NetR22_1: R22.1 U7.9 | length 3.6
  Top Layer w0.254: R22.1@40.526,19.456 40.526,18.376 41.176,17.726 U7.9@41.176,16.109
NetR44_2: R44.2 U8.7 | length 1.4
  Top Layer w0.229: U8.7@79.404,72.486 79.404,72.345 79.439,72.309 79.95,72.309 80.414,71.846 R44.2@80.503,71.846
NetR45_2: R45.2 U9.7 | length 1.4
  Top Layer w0.229: U9.7@57.991,72.486 57.991,72.345 58.027,72.309 58.538,72.309 59.002,71.846 R45.2@59.091,71.846
NetR46_2: R46.2 U8.9 | length 1
  Top Layer w0.254: U8.9@78.754,75.286 78.754,75.436 78.901,75.583 R46.2@78.901,76.251
NetR47_2: R47.2 U9.9 | length 1
  Top Layer w0.254: U9.9@57.341,75.286 57.341,75.436 57.489,75.583 R47.2@57.489,76.251
NetR48_1: R48.1 U8.4 | length 3.8
  Top Layer w0.229: R48.1@77.174,68.847 77.263,68.847 77.489,69.072 77.489,72.45 U8.4@77.454,72.486
NetR49_1: R49.1 U8.1 | length 4.5
  Top Layer w0.229: R49.1@75.156,68.847 75.156,69.368 74.639,69.884 74.639,72.138 74.988,72.486 U8.1@75.504,72.486
NetR50_1: R50.1 U9.4 | length 3.8
  Top Layer w0.229: R50.1@55.762,68.847 55.851,68.847 56.077,69.072 56.077,72.45 U9.4@56.041,72.486
NetR51_1: R51.1 U9.1 | length 4.5
  Top Layer w0.229: R51.1@53.744,68.847 53.744,69.368 53.227,69.884 53.227,72.138 53.575,72.486 U9.1@54.091,72.486
NetR60_2: R60.2 R64.1 U10.1 | length 4.8
  Top Layer w0.203: U10.1@30.758,17.926 R64.1@30.758,16.708 R60.2@31.945,16.708
  Top Layer w0.254: U10.1@30.758,17.926 R64.1@30.758,16.708 R60.2@31.945,16.708
NetR61_2: R61.2 R70.1 U10.4 | length 4.8
  Top Layer w0.203: U10.4@30.758,19.876 R70.1@30.758,21.08 R61.2@31.945,21.08
  Top Layer w0.254: U10.4@30.758,19.876 R70.1@30.758,21.08 R61.2@31.945,21.08
NetR62_2: R62.2 R65.1 U11.1 | length 2.4
  Top Layer w0.254: R62.2@37.892,67.843 R65.1@37.892,69.031 U11.1@39.11,69.031
NetR63_2: R63.2 R71.1 U11.4 | length 2.4
  Top Layer w0.254: U11.4@41.06,69.031 R71.1@42.264,69.031 R63.2@42.264,67.843
NetR72_1: R72.1 R76.1 R78.1 U10.7 | length 6.6
  Top Layer w0.203: R78.1@22.559,19.566 22.559,18.828 R76.1@22.77,18.616 22.833,18.616 23.206,18.989 25.813,18.989 26.226,18.576 27.041,18.576 U10.7@27.958,18.576
NetR74_1: R74.1 R77.1 R80.1 U11.7 | length 6.6
  Top Layer w0.203: U11.7@39.76,71.831 39.76,72.748 39.76,73.562 40.173,73.975 40.173,76.583 39.8,76.955 R77.1@39.8,77.019 40.012,77.23 R80.1@40.75,77.23
NetR82_2: R82.2 U12.7 | length 1.8
  Top Layer w0.229: U12.7@17.344,72.391 R82.2@17.344,74.143
NetR83_2: R83.2 U12.8 | length 1.8
  Top Layer w0.229: U12.8@16.074,72.391 R83.2@16.074,74.143
NetR84_1: R84.1 U12.10 | length 2
  Top Layer w0.254: R84.1@17.344,65.481 U12.10@17.344,67.201 U12.10@17.344,67.461
NetR85_1: R85.1 U12.9 | length 2
  Top Layer w0.254: R85.1@16.074,65.481 U12.9@16.074,67.201 U12.9@16.074,67.461
NetR88_2: R88.2 R89.2 U13.8 | length 7.2
  Top Layer w0.254: R88.2@107.457,46.51 R89.2@106.594,46.51 106.594,45.952 106.829,45.717 109.405,45.717 109.823,46.135 U13.8@112.074,46.135
NetR90_2: R90.2 U13.57 | length 3
  Top Layer w0.254: U13.57@116.224,50.285 R90.2@116.224,53.308
NetR91_2: R91.2 U13.44 | length 2.8
  Top Layer w0.254: U13.44@120.874,47.635 R91.2@123.713,47.635
NetR97_1: R97.1 U14.7 | length 1.4
  Top Layer w0.254: R97.1@130.152,44.342 U14.7@130.152,45.782
NetTP5_1: TP5.1 U13.10 | length 13
  Top Layer w0.254: TP5.1@102.898,40.468 102.898,43.637 103.628,44.367 109.823,44.367 110.591,45.135 U13.10@112.074,45.135
nFAULT_CAN: U3.19 U8.8 | length 67.7
  Top Layer w0.203: U3.19@49.376,42.448 49.317,42.507 49.317,43.324 49.079,43.562 47.241,43.562 46.481,44.322 46.481,60.614 47.993,62.125 v1(66.751,62.125)
  Top Layer w0.229: U8.8@79.404,75.286 v1(80.076,75.286)
  Bottom Layer w0.203: v1(66.751,62.125) 66.751,73.863 68.174,75.286 v1(80.076,75.286)
nFAULT_CAN_2: U6.5 U9.8 | length 59.6
  Top Layer w0.203: v1(39.985,35.284) U6.5@39.985,36.733
  Top Layer w0.229: U9.8@57.991,75.286 v1(58.664,75.286)
  Bottom Layer w0.203: v1(39.985,35.284) 39.985,60.899 40.715,61.628 46.231,61.628 46.714,62.112 46.714,74.421 47.579,75.286 v1(58.664,75.286)
NRST: C24.2 R43.1 SW1.2 U4.12 | length 15
  Top Layer w0.203: SW1.2@59.666,46.109 59.666,45.108 59.895,44.879 C24.2@61.749,44.879 R43.1@62.79,44.879 v1(63.698,44.879) ; U4.12@71.095,44.439 v1(72.263,44.439)
  Bottom Layer w0.203: v1(63.698,44.879) 71.823,44.879 v1(72.263,44.439)
nSTB_CAN: U3.20 U8.14 | length 64.6
  Top Layer w0.203: U3.20@48.726,42.448 48.726,43.042 48.667,43.1 46.988,43.1 46.013,44.075 46.013,60.897 47.905,62.789 v1(65.202,62.789) ; U8.14@75.504,75.286 v1(75.504,76.606)
  Bottom Layer w0.203: v1(65.202,62.789) 65.202,74.356 67.452,76.606 v1@75.489,76.606
nSTB_CAN_2: U6.3 U9.14 | length 45.7
  Top Layer w0.203: U6.3@41.255,42.233 41.255,60.051 v1(43.536,62.332) ; U9.14@54.091,75.286 v1(54.091,76.606)
  Bottom Layer w0.203: v1(43.536,62.332) 44.379,63.175 44.379,74.859 46.126,76.606 v1(54.091,76.606)
OUT1_1: J20.1 U5.10 | length 27.1
  Top Layer w0.254: J20.1@61.933,2.591 61.933,9.338 64.92,12.325 76.61,12.325 77.108,12.823 U5.10@77.108,16.565
OUT1_2: J20.2 U5.11 | length 19.9
  Top Layer w0.254: J20.2@64.433,2.591 64.433,8.985 66.413,10.965 U5.11@77.108,10.965
OUT1_3: J20.3 U5.12 | length 18.3
  Top Layer w0.254: J20.3@66.933,2.591 66.933,8.484 68.097,9.648 77.438,9.648 77.758,9.968 U5.12@77.758,10.965
OUT1_4: J20.4 U5.14 | length 17
  Top Layer w0.254: J20.4@69.433,2.591 69.433,7.812 70.511,8.89 78.41,8.89 79.058,9.538 U5.14@79.058,10.965
OUT2_1: J26.1 U5.16 | length 15.4
  Top Layer w0.254: U5.16@80.358,10.965 80.358,8.752 81.058,8.052 87.351,8.052 88.341,7.061 J26.1@88.341,2.591
OUT2_2: J26.2 U5.17 | length 17.3
  Top Layer w0.254: U5.17@81.008,10.965 81.008,9.38 81.498,8.89 89.751,8.89 90.841,7.8 J26.2@90.841,2.591
OUT2_3: J26.3 U5.19 | length 18.4
  Top Layer w0.254: U5.19@82.308,10.965 82.308,9.968 82.628,9.648 91.969,9.648 93.341,8.276 J26.3@93.341,2.591
OUT2_4: J26.4 U5.20 | length 20.3
  Top Layer w0.254: U5.20@82.958,10.965 94.27,10.965 95.841,9.394 J26.4@95.841,2.591
OUT3_1: J30.1 U7.10 | length 21.7
  Top Layer w0.254: J30.1@30.604,2.591 30.604,9.338 33.136,11.869 40.028,11.869 40.526,12.367 U7.10@40.526,16.109